# Altium PCB Electrode_Test_Board_v3.2.PcbDoc
Units mil, origin at the board's own origin, x right, y up, seen from the top; angles counter-clockwise.
Board outline 688.39 x 1242.84 mil, 2 copper layers (Top Layer, Bottom Layer), stack 61.811 mil thick; 45 components, 24 nets, 100 pads, 29 vias.
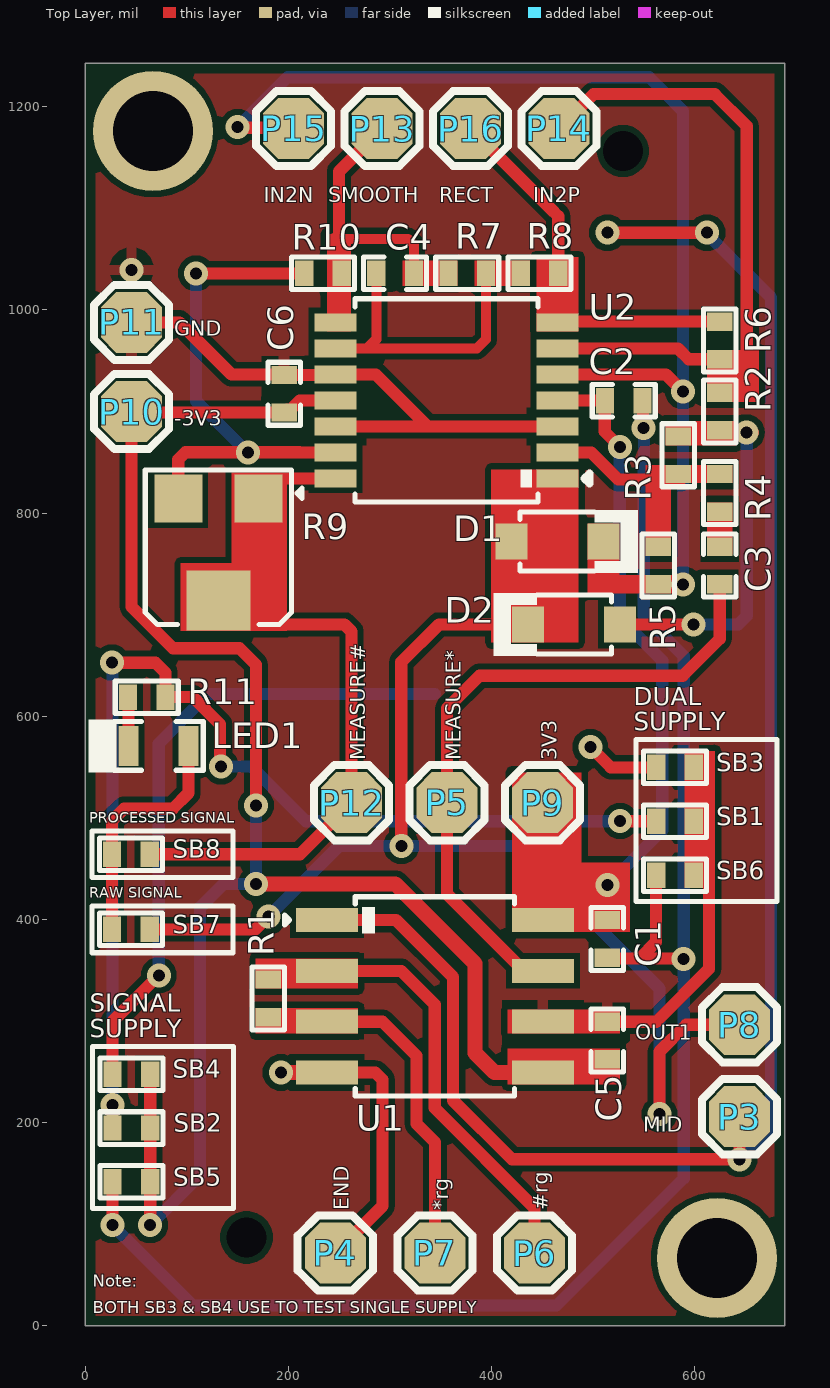
[diagram p0: Top Layer view]
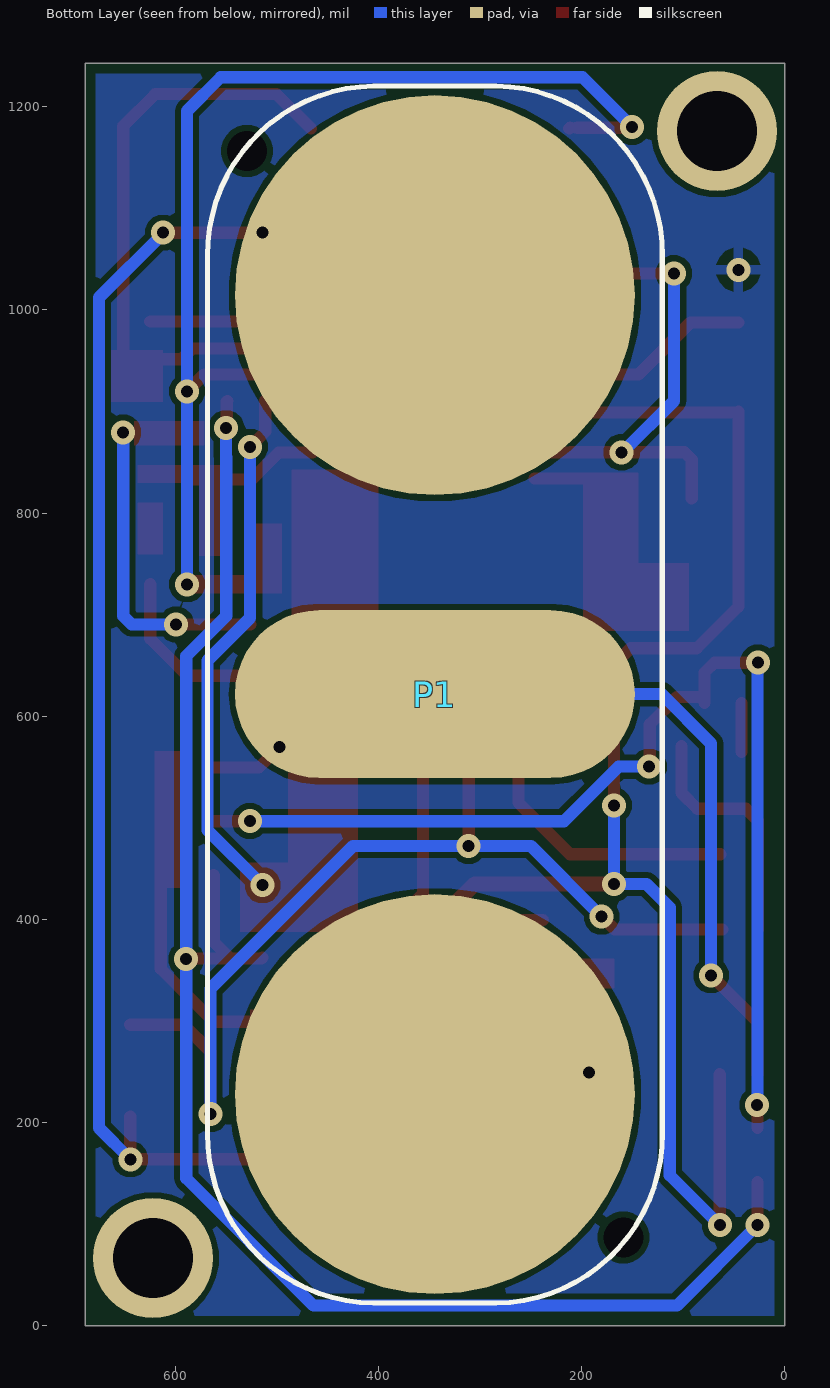
[diagram p1: Bottom Layer view, seen from below]
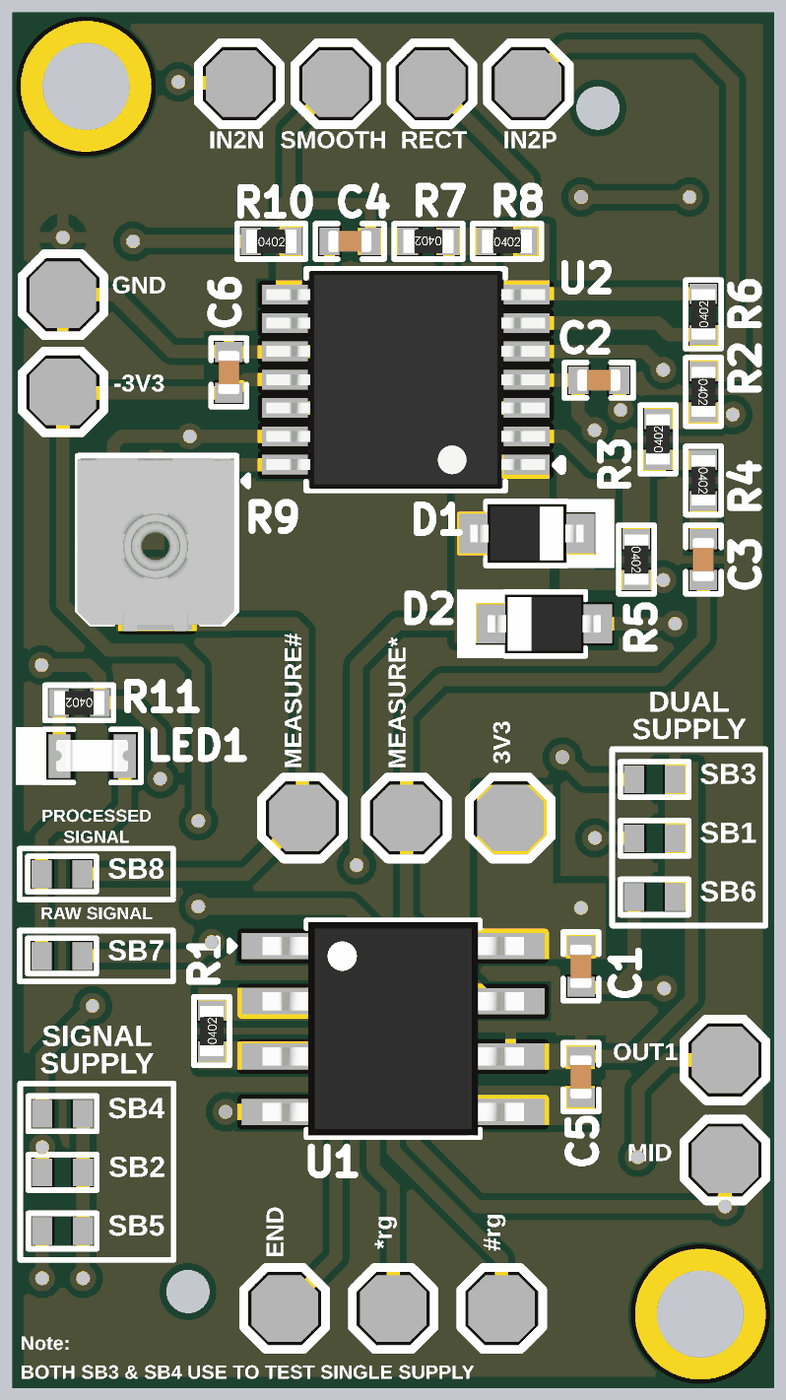
[diagram p2: 3D render of the assembled board from above, using the file's embedded part models]

## Layer stack, top to bottom
Top Solder: solder mask 0.394, SM-001, Dk 3.5
Top Layer: signal copper 1.378
Core: core 59.055, FR-4, Dk 4.8
Bottom Layer: signal copper 1.378
Bottom Solder: solder mask 0.394, SM-001, Dk 3.5

## Board outline
0,0 -0.04,1242.82 688.35,1242.79 688.34,-0.02

## Design rules (kind name [scope] priority, off if disabled: settings)
BoardOutlineClearance [All] p1: gap=0 ignorepadtopadclearanceinfootprint=FALSE except(10: Poly-OutlineEdge)
Clearance [All] p1: gap=6 ignorepadtopadclearanceinfootprint=FALSE except(4: Arc-SMDPad Track-SMDPad SMDPad-SMDPad)
MinimumSolderMaskSliver [All] p1: minsoldermaskwidth=0
PolygonConnect [All] p1: connectstyle=Relief reliefconductorwidth=10 reliefentries=4 polygonreliefangle="90 Angle" airgapwidth=10
RoutingVias [All] p1: holewidth=11.81 width=23.62 viastyle="Through Hole" minholewidth=7.87 minwidth=13.78 maxholewidth=31.5 maxwidth=62.99
SilkToSilkClearance [All] p1: silktosilkclearance=0
SilkToSolderMaskClearance [IsPad] p1: minsilkscreentomaskgap=0 clearancetoexposedcopper=TRUE
SolderMaskExpansion [All] p1: expansion=4 istentingtop=FALSE
Width [All] p1: maxlimit=50 minlimit=10 preferedwidth=15 minimp=50.000000 maximp=50.000000 favimp=50.000000
27 further rules are at their usual default settings.

## Components (designator, comment, footprint, x,y, rotation, side; value= is the part's Value field where it differs from the comment)
C1 "1uF" Cap-0402 513.77,380.97 r270 top
C2 "0.1uF" Cap-0402 529.95,910.52 r0 top
C3 "10nF" Cap-0402 624.47,748.5 r90 top
C4 "1uF" Cap-0402 304.95,1036.02 r180 top
C5 "1uF" Cap-0402 513.77,280.97 r90 top
C6 "0.1uF" Cap-0402 195.63,917.56 r90 top
D1 "1N4148WS" SOD-323 480.78,690.47 r0 top
D2 "1N4148WS" SOD-323 464.97,772 r180 top
LED1 "Orange" LED-0603 72.08,570.98 r180 top
P1 "SEMG Sensor" sEMG-sensor 344.17,621.41 r0 bottom locked
P3 "Test Point" Test-point 644,206 r180 top
P4 "Test Point" Test-point 246.09,71.8 r270 top
P5 "TEST POINT" Test-point 356.04,515 r270 top
P6 "TEST POINT" Test-point 442.23,71.8 r270 top
P7 "TEST POINT" Test-point 344.16,71.8 r270 top
P8 "TEST POINT" Test-point 644,296.47 r0 top
P9 "TEST POINT" Test-point 450.05,515 r90 top
P10 "TEST POINT" Test-point 45.54,900.02 r0 top
P11 "TEST POINT" Test-point 45.54,987.79 r0 top
P12 "TEST POINT" Test-point 262.04,515 r0 top
P13 "TEST POINT" Test-point 292.08,1178.57 r90 top
P14 "TEST POINT" Test-point 466.23,1178.57 r90 top
P15 "TEST POINT" Test-point 205,1178.57 r90 top
P16 "TEST POINT" Test-point 379.15,1178.57 r0 top
R1 "240R" Res-0402 180.12,322.47 r90 top
R2 "150K" Res-0402 624.47,900.02 r270 top
R3 "150K" Res-0402 583.47,857.02 r90 top
R4 "150K" Res-0402 624.47,820.02 r270 top
R5 "150K" Res-0402 563.92,748.51 r270 top
R6 "150K" Res-0402 624.47,970.02 r90 top
R7 "80.6K" Res0402 375.96,1036.02 r180 top
R8 "80.6K" Res0402 446.97,1036.02 r0 top
R9 "100K" TC33X-2-104E_ 170.24,814.59 r180 top
R10 "1K" Res-0402 233.95,1036.02 r0 top
R11 "1K" Res-0402 60.5,619 r180 top
SB1 "Solder Bridge 0402" "Solder Bridge 0402" 580.34,496.69 r180 top
SB2 "Solder Bridge 0402" "Solder Bridge 0402" 45.34,194.8 r180 top
SB3 "Solder Bridge 0402" "Solder Bridge 0402" 580.34,549.8 r0 top
SB4 "Solder Bridge 0402" "Solder Bridge 0402" 45.34,247.8 r0 top
SB5 "Solder Bridge 0402" "Solder Bridge 0402" 45.34,141.8 r0 top
SB6 "Solder Bridge 0402" "Solder Bridge 0402" 580.34,443.59 r0 top
SB7 "Solder Bridge 0402" "Solder Bridge 0402" 44.84,390.35 r180 top
SB8 "Solder Bridge 0402" "Solder Bridge 0402" 44.84,464.3 r180 top
U1 "AD8221ARZ-R7" SOIC-8 344.1,324.47 r0 top
U2 "TL084CPWR" 14-TSSOP 355.47,911.02 r180 top

## Footprints (in the part's own frame and the unit in brackets; to place one, negate y for a bottom-side part, rotate by r counter-clockwise, add the part's x,y. Pads: shape width x height; smd on the part's side, far side on the other; paste and mask are expansions set on the pad)
14-TSSOP [mm]
  rect 1.05x0.45 smd: 1(-2.775,1.95) 2(-2.775,1.3) 3(-2.775,0.65) 4(-2.775,0) 5(-2.775,-0.65) 6(-2.775,-1.3) 7(-2.775,-1.95) 8(2.775,-1.95) 9(2.775,-1.3) 10(2.775,-0.65) 11(2.775,0) 12(2.775,0.65) 13(2.775,1.3) 14(2.775,1.95)
  silkscreen extent -3.58,-2.54 2.29,2.54, body extent -3.2,-2.5 3.2,2.5, height 1.2
Cap-0402 [mil]
  rect 18x25 smd mask+2.36: 1(-18.5,0) 2(18.5,0)
  silkscreen extent -31,-16 31,16, body extent -20,-10 20,10, height 19
LED-0603 [mm]
  rect 0.5x1 smd: 1(-0.75,0) 2(0.75,0)
  silkscreen extent -1.12,-0.66 1.75,0.66, body extent -0.82,-0.37 0.82,0.36, height 0.68
Res0402 [mil]
  rect 18x25 smd mask+4: 1(-18.5,0) 2(18.5,0)
  silkscreen extent -32,-17 32,16, body extent -23,-11 23,11, height 16
Res-0402 [mil]
  rect 18x25 smd mask+2.17: 1(-18.5,0) 2(18.5,0)
  silkscreen extent -32,-17 32,16, body extent -23,-11 23,11, height 16
sEMG-sensor [mm]
  round 10 smd: 1(0,9.987) 2(0,-9.987)
  oval 10x4.2 smd: 3(0,-0.013)
  silkscreen extent -5.68,-15.21 5.68,15.21
SOD-323 [mm]
  rect 0.8x0.9 smd mask+0.055: 1(-1.15,0) 2(1.15,0)
  silkscreen extent -2.01,-0.79 0.94,0.79, body extent -1.3,-0.67 1.3,0.67, height 1.1
SOIC-8 [mm]
  rect 1.55x0.6 smd: 1(-2.7,1.905) 2(-2.7,0.635) 3(-2.7,-0.635) 4(-2.7,-1.905) 5(2.7,-1.905) 6(2.7,-0.635) 7(2.7,0.635) 8(2.7,1.905)
  silkscreen extent -3.76,-2.49 1.99,2.49, body extent -3,-2.45 3,2.45, height 1.7
"Solder Bridge 0402" [mil]
  rect 18x25 smd mask+2.17: 1(-18.5,0) 2(18.5,0)
  silkscreen extent -32,-17 32,16
TC33X-2-104E_ [mm]
  rect 1.2x1.2 smd: 1(0,0) 3(2,0)
  rect 1.6x1.5 smd: 2(1,2.55)
  silkscreen extent -1.09,-0.71 2.83,3.15, body extent -0.76,-0.64 2.84,3.32, height 1.13
Test-point [mil]
  oct 60x60 smd: 1(0,0)
  silkscreen extent -37,-37 37,37

## Part data
C1 C4 C5: library part CC0402KRX5R7BB105, "CAP CER 1UF 16V X5R 0402", Case Code (Imperial)=0402, Case Code (Metric)=1005, Dielectric=X5R, LCSC Part Number=C325464, Manufacturer=Yageo, Max Operating Temperature=85°C, Min Operating Temperature=-55°C, Supplier Part Number 1=311-1691-6-ND, Tolerance=10%, Voltage Rating=16V, Capacitance=1uF, Case/Package=0402, ComponentLink1Description=http://www.yageo.com/documents/recent/UPY-GPHC_X5R_4V-to-50V_12.pdf?src-supplier=Avnet+Europe, ComponentLink1URL=http://www.yageo.com/documents/recent/UPY-GPHC_X5R_4V-to-50V_12.pdf?src-supplier=Avnet+Europe, Composition=Ceramic, Depth=0.5mm, Halogen Free="Halogen Free", Height=0.5mm, Item Type=Capacitor, Lead Free="Lead Free", Length=1mm, Manufacturer Part Number=CC0402KRX5R7BB105, Mount="Surface Mount", Packaging="Tape and Reel", Pricing 1="1=0.36, 10=0.252, 100=0.1512, 500=0.1134, 1000=0.09576, 2500=0.09072, 5000=0.08568 (USD)", Radiation Hardening=No, Stock 1=1405667, Supplier 1=Digi-Key, Termination=SMD/SMT, Thickness=0.022inch, Voltage Rating (DC)=16V, Weight=2.3E-05oz, Width=0.02inch
C2 C6: library part GRM155R71H104ME14D, "CAP CER 0.1UF 50V X7R 0402", Capacitance=100nF, Case/Package=0402, LCSC Part Number=C182412, Manufacturer=Murata, Max Operating Temperature=125°C, Min Operating Temperature=-55°C, Tolerance=20%, Voltage Rating=50V, Category="Ceramic Capacitors", ComponentLink1Description=http://www.mouser.com/ds/2/281/c02e-2905.pdf?src-supplier=Mouser, ComponentLink1URL=http://www.mouser.com/ds/2/281/c02e-2905.pdf?src-supplier=Mouser, ComponentLink2Description=http://search.murata.co.jp/Ceramy/image/img/A01X/G101/ENG/GRM155R71H104ME14-01.pdf?src-supplier=Digi-Key, ComponentLink2URL=http://search.murata.co.jp/Ceramy/image/img/A01X/G101/ENG/GRM155R71H104ME14-01.pdf?src-supplier=Digi-Key, ComponentLink3Description=http://psearch.en.murata.com/capacitor/product/GRM155R71H104ME14%23.pdf?src-supplier=Avnet, ComponentLink3URL=http://psearch.en.murata.com/capacitor/product/GRM155R71H104ME14%23.pdf?src-supplier=Avnet, Item Type=Capacitor, Length=0.039inch, Manufacturer Part Number=GRM155R71H104ME14D, Mount="Surface Mount", Packaging="Cut Tape", Pricing 1="10000=0.00444, 20000=0.00420, 40000=0.00396, 60000=0.00372, 80000=0.00348, 100000=0.00324, 1000000=0.00300 (USD)", RoHS=Yes, RoHS Compliant=Yes, Stock 1=100000, Supplier 1=Avnet, Supplier Part Number 1=GRM155R71H104ME14D, Thickness=0.022inch, Width=0.02inch
C3: library part CC0402KRX7R9BB103, "CAP CER 10000PF 50V X7R 0402", Case Code (Imperial)=0402, Case Code (Metric)=1005, Dielectric=X7R, LCSC Part Number=C60133, Manufacturer=Yageo, Max Operating Temperature=125°C, Min Operating Temperature=-55°C, Package Quantity=1, Resistor Type=Ceramic, Tolerance=10%, Voltage=50V, Capacitance=10nF, Case/Package=0402, Category="Ceramic Capacitors", ComponentLink1Description=https://datasheet.ciiva.com/11788/0900766b8079c870-11788375.pdf?src-supplier=RSComponents, ComponentLink1URL=https://datasheet.ciiva.com/11788/0900766b8079c870-11788375.pdf?src-supplier=RSComponents, ComponentLink2Description=https://datasheet.ciiva.com/26862/getdatasheetpartid-138248-26862642.pdf?src-supplier=Verical, ComponentLink2URL=https://datasheet.ciiva.com/26862/getdatasheetpartid-138248-26862642.pdf?src-supplier=Verical, ComponentLink3Description=https://datasheet.ciiva.com/7978/1489800-7978093.pdf?src-supplier=Element14, ComponentLink3URL=https://datasheet.ciiva.com/7978/1489800-7978093.pdf?src-supplier=Element14, ComponentLink4Description=https://datasheet.ciiva.com/28450/1489800-28450377.pdf?src-supplier=Element14, ComponentLink4URL=https://datasheet.ciiva.com/28450/1489800-28450377.pdf?src-supplier=Element14, ComponentLink5Description=https://datasheet.ciiva.com/176/mlccorderingcode-176349.pdf?src-supplier=Digi-Key, ComponentLink5URL=https://datasheet.ciiva.com/176/mlccorderingcode-176349.pdf?src-supplier=Digi-Key, ComponentLink6Description=https://datasheet.ciiva.com/176/mlccorderingcode-176348.pdf?src-supplier=Digi-Key, ComponentLink6URL=https://datasheet.ciiva.com/176/mlccorderingcode-176348.pdf?src-supplier=Digi-Key, ComponentLink7Description=https://datasheet.ciiva.com/176/mlccorderingcode-176350.pdf?src-supplier=Digi-Key, ComponentLink7URL=https://datasheet.ciiva.com/176/mlccorderingcode-176350.pdf?src-supplier=Digi-Key, Depth=0.5mm, Halogen Free="Halogen Free", Height=0.5mm, Item Type=Capacitor, Lead Free="Lead Free", Length=1mm, Manufacturer Part Number=CC0402KRX7R9BB103, Mount="Surface Mount", Packaging="Tape and Reel", Pricing 1="10000=0.00178 (USD)", Radiation Hardening=No, Reach SVHC Compliant=Yes, RoHS=Yes, RoHS Compliant=Yes, Series=CC, Stock 1=995000, Supplier 1=Avnet, Supplier Part Number 1=CC0402KRX7R9BB103, Termination=SMD/SMT, Thickness=0.022inch, Voltage Rating=50V, Voltage Rating (DC)=50V, Width=0.02inch
D1 D2: "100V -55℃~+150℃@(Tj) 400mW Single 1.25V@150mA 4ns 1μA@75V 200mA SOD-323 Switching Diode ROHS", Manufacturer=YFW, ComponentLink1Description=LCSC, ComponentLink1URL=https://lcsc.com/product-detail/Switching-Diode_YFW-1N4148WS_C1884546.html, Manufacturer Part Number=1N4148WS
LED1: library part 19-217/S2C-AQ1R1B/3T, "0603(H=0.4mm) λD=600.5~612.5nm VR=5V VF=1.7V~2.2V IF=25mA PD=60mW", LCSC Part Number=C146215, Manufacturer=Everlight, Supplier Part Number 1=1080-19-217/S2C-AQ1R1B/3TTR-ND, Category=LEDs, ComponentLink1Description=LCSC, ComponentLink1URL=https://www.lcsc.com/product-detail/Light-Emitting-Diodes-LED_Everlight-Elec-19-217-S2C-AQ1R1B-3T_C146215.html, Item Type=LED, Manufacturer Part Number=19-217/S2C-AQ1R1B/3T, RoHS=No, Supplier 1=Digi-Key
P1: "Sensor Connecting Pads"
P3 P4: library part "TEST POINT", "Test Point ON", Item Type="TEST POINT"
P5 P6 P7 P8 P9 P10 P11 P12 P13 P14 P15 P16: "Test Point ON", Item Type="TEST POINT"
R1: library part RC0402FR-07240RL, "RES 240 OHM 1% 1/16W 0402", Case Code (Imperial)=0402, Case Code (Metric)=1005, Manufacturer=Yageo, Max Operating Temperature=155°C, Max Power Dissipation=63mW, Min Operating Temperature=-55°C, Package Quantity=1, Resistance Tolerance=1%, Resistor Type="Thick Film", Supplier Part Number 1=603-RC0402FR-07240RL, Temperature Coefficient=100ppm/°C, Voltage Rating=50V, Case/Package=0402, Category="Chip SMD Resistors", ComponentLink1Description=https://datasheet.ciiva.com/7849/1018594-7849915.pdf?src-supplier=Element14, ComponentLink1URL=https://datasheet.ciiva.com/7849/1018594-7849915.pdf?src-supplier=Element14, ComponentLink2Description=https://datasheet.ciiva.com/7849/1018594-7849916.pdf?src-supplier=Element14, ComponentLink2URL=https://datasheet.ciiva.com/7849/1018594-7849916.pdf?src-supplier=Element14, ComponentLink3Description=https://datasheet.ciiva.com/2519/pyu-r-int-thick-7-2519157.pdf?src-supplier=Digi-Key, ComponentLink3URL=https://datasheet.ciiva.com/2519/pyu-r-int-thick-7-2519157.pdf?src-supplier=Digi-Key, ComponentLink4Description=https://datasheet.ciiva.com/2519/pyu-r-int-thick-7-2519158.pdf?src-supplier=Digi-Key, ComponentLink4URL=https://datasheet.ciiva.com/2519/pyu-r-int-thick-7-2519158.pdf?src-supplier=Digi-Key, ComponentLink5Description=https://datasheet.ciiva.com/2519/pyu-r-int-thick-7-2519156.pdf?src-supplier=Digi-Key, ComponentLink5URL=https://datasheet.ciiva.com/2519/pyu-r-int-thick-7-2519156.pdf?src-supplier=Digi-Key, ComponentLink6Description=https://datasheet.ciiva.com/12669/pyu-rc0402-51-rohs-l-6-r-12669689.pdf?src-supplier=Mouser, ComponentLink6URL=https://datasheet.ciiva.com/12669/pyu-rc0402-51-rohs-l-6-r-12669689.pdf?src-supplier=Mouser, ComponentLink7Description=https://datasheet.ciiva.com/17419/pyu-rc0402-51-rohs-l-6-r-17419482.pdf?src-supplier=Future+Electronics, ComponentLink7URL=https://datasheet.ciiva.com/17419/pyu-rc0402-51-rohs-l-6-r-17419482.pdf?src-supplier=Future+Electronics, Construction=Rectangular, Depth=0.5mm, Features="Moisture Resistant", Height=0.016inch, Lead Free="Lead Free", Length=1mm, Manufacturer Part Number=RC0402FR-07240RL, Military Standard=Not, Number of Terminations=2, Packaging="Tape and Reel", Power Rating=63mW, Pricing 1="1=0.10000, 10=0.01200, 50=0.01200, 100=0.00500, 1000=0.00300, 10000=0.00100 (USD)", REACH SVHC=Unknown, Resistance=240R, RoHS=Yes, RoHS Compliant=Yes, Series=RC, Size Code=0402, Stock 1=1903202, Supplier 1=Mouser, Termination=SMD/SMT, Tolerance=1%, Voltage Rating (DC)=50V, Width=0.02inch
R2 R3 R4 R5 R6: library part RC0402JR-07150KL, "RES SMD 0402 150kOhm 5% Paper T/R", Case Code (Imperial)=0402, Case Code (Metric)=1005, LCSC Part Number=C137919, Manufacturer=Yageo, Max Operating Temperature=155°C, Max Power Dissipation=63mW, Min Operating Temperature=-55°C, Package Quantity=1, Resistance=150kR, Resistance Tolerance=5%, Resistor Type="Thick Film", Temperature Coefficient=100ppm/°C, Voltage Rating=50V, Case/Package=0402, Category="Chip SMD Resistors", ComponentLink1Description=https://datasheet.ciiva.com/7983/1018594-7983551.pdf?src-supplier=Element14, ComponentLink1URL=https://datasheet.ciiva.com/7983/1018594-7983551.pdf?src-supplier=Element14, ComponentLink2Description=https://datasheet.ciiva.com/2518/pyu-r-int-thick-7-2518929.pdf?src-supplier=Digi-Key, ComponentLink2URL=https://datasheet.ciiva.com/2518/pyu-r-int-thick-7-2518929.pdf?src-supplier=Digi-Key, ComponentLink3Description=https://datasheet.ciiva.com/2518/pyu-r-int-thick-7-2518930.pdf?src-supplier=Digi-Key, ComponentLink3URL=https://datasheet.ciiva.com/2518/pyu-r-int-thick-7-2518930.pdf?src-supplier=Digi-Key, ComponentLink4Description=https://datasheet.ciiva.com/2518/pyu-r-int-thick-7-2518928.pdf?src-supplier=Digi-Key, ComponentLink4URL=https://datasheet.ciiva.com/2518/pyu-r-int-thick-7-2518928.pdf?src-supplier=Digi-Key, ComponentLink5Description=https://datasheet.ciiva.com/7850/1018594-7850149.pdf?src-supplier=Element14, ComponentLink5URL=https://datasheet.ciiva.com/7850/1018594-7850149.pdf?src-supplier=Element14, ComponentLink6Description=https://datasheet.ciiva.com/17072/pyu-rc0402-51-rohs-l-6-r-17072379.pdf?src-supplier=Future+Electronics, ComponentLink6URL=https://datasheet.ciiva.com/17072/pyu-rc0402-51-rohs-l-6-r-17072379.pdf?src-supplier=Future+Electronics, ComponentLink7Description=https://datasheet.ciiva.com/15189/getdatasheetpartid-251830-15189543.pdf?src-supplier=Verical, ComponentLink7URL=https://datasheet.ciiva.com/15189/getdatasheetpartid-251830-15189543.pdf?src-supplier=Verical, Construction=Rectangular, Depth=0.5mm, Features="Moisture Resistant", Height=0.016inch, Item Type=Resistor, Lead Free="Lead Free", Length=1mm, Manufacturer Part Number=RC0402JR-07150KL, Military Standard=Not, Number of Terminations=2, Packaging="Tape and Reel", Power Rating=63mW, Pricing 1="10000=0.00100 (USD)", REACH SVHC="No SVHC", RoHS=Yes, RoHS Compliant=Yes, Series=RC, Size Code=0402, Stock 1=170000, Supplier 1="Arrow Electronics", Supplier Part Number 1=RC0402JR-07150KL, Termination=SMD/SMT, Tolerance=5%, Weight=2.3E-05oz, Width=0.02inch
R7 R8: library part RC-02W8062FT, "1/16W 50V ±1% ±200ppm/℃ -55℃~+155℃ 80.6kΩ 0402 Chip Resistor - Surface Mount ROHS", Manufacturer=FH, Manufacture Part Number=RC-02W8062FT
R9: library part TC33X-2-104E, "TRIMMER 100K OHM 0.1W J LEAD TOP", Color=Silver, LCSC Part Number=C719186, Manufacturer=Bourns, Max Operating Temperature=100°C, Max Power Dissipation=100mW, Min Operating Temperature=-40°C, Package Quantity=2500, Resistance=100kR, Resistance Tolerance=25%, Resistor Type=Carbon,Cermet, Temperature Coefficient=250ppm/°C, Voltage Rating (DC)=50V, Category="Variable Resistors and Potentiometers", ComponentLink1Description=https://datasheet.ciiva.com/11832/0900766b802749b3-11832506.pdf?src-supplier=RSComponents, ComponentLink1URL=https://datasheet.ciiva.com/11832/0900766b802749b3-11832506.pdf?src-supplier=RSComponents, ComponentLink2Description=https://datasheet.ciiva.com/8700/tc33-8700395.pdf?src-supplier=Avnet, ComponentLink2URL=https://datasheet.ciiva.com/8700/tc33-8700395.pdf?src-supplier=Avnet, ComponentLink3Description=https://datasheet.ciiva.com/2155/tc33-2155965.pdf?src-supplier=Digi-Key, ComponentLink3URL=https://datasheet.ciiva.com/2155/tc33-2155965.pdf?src-supplier=Digi-Key, ComponentLink4Description=https://datasheet.ciiva.com/7953/1818686-7953181.pdf?src-supplier=Element14, ComponentLink4URL=https://datasheet.ciiva.com/7953/1818686-7953181.pdf?src-supplier=Element14, ComponentLink5Description=https://datasheet.ciiva.com/16716/70155234-16716301.pdf?src-supplier=Allied+Electronics, ComponentLink5URL=https://datasheet.ciiva.com/16716/70155234-16716301.pdf?src-supplier=Allied+Electronics, ComponentLink6Description=https://datasheet.ciiva.com/2155/tc33-2155966.pdf?src-supplier=Digi-Key, ComponentLink6URL=https://datasheet.ciiva.com/2155/tc33-2155966.pdf?src-supplier=Digi-Key, ComponentLink7Description=https://datasheet.ciiva.com/7953/1818686-7953182.pdf?src-supplier=Element14, ComponentLink7URL=https://datasheet.ciiva.com/7953/1818686-7953182.pdf?src-supplier=Element14, ComponentLink8Description=https://datasheet.ciiva.com/2155/tc33-2155967.pdf?src-supplier=Digi-Key, ComponentLink8URL=https://datasheet.ciiva.com/2155/tc33-2155967.pdf?src-supplier=Digi-Key, Depth=3.8mm, Height=0.047inch, Item Type=Trimmer, Length=3mm, Manufacturer Part Number=TC33X-2-104E, Military Standard=Not, Mount="Surface Mount", Number of Turns=1, Packaging="Tape and Reel", Power Rating=100mW, Pricing 1="2500=0.15500, 5000=0.13130 (USD)", Radiation Hardening=No, REACH SVHC="No SVHC", RoHS=Yes, RoHS Compliant=Yes, Series=TC33, Stock 1=12500, Supplier 1="Arrow Electronics", Supplier Part Number 1=TC33X-2-104E, Termination="Foot Print", Tolerance=25%, Weight=29.4mg, Width=0.118inch
R10 R11: library part RC0402JR-071KL, "RES 1K OHM 5% 1/16W 0402", Case Code (Imperial)=0402, Case Code (Metric)=1005, LCSC Part Number=C105637, Manufacturer=Yageo, Max Operating Temperature=155°C, Max Power Dissipation=63mW, Min Operating Temperature=-55°C, Package Quantity=1, Power Rating=62.5mW, Resistance=1kR, Resistance Tolerance=5%, Resistor Type="Thick Film", Supplier Part Number 1=311-1.0KJRCT-ND, Temperature Coefficient=100ppm/°C, Voltage Rating=50V, Case/Package=0402, Category="Chip SMD Resistors", ComponentLink1Description=https://datasheet.ciiva.com/7983/1018594-7983558.pdf?src-supplier=Element14, ComponentLink1URL=https://datasheet.ciiva.com/7983/1018594-7983558.pdf?src-supplier=Element14, ComponentLink2Description=https://datasheet.ciiva.com/2452/pyu-r-int-thick-7-2452756.pdf?src-supplier=Digi-Key, ComponentLink2URL=https://datasheet.ciiva.com/2452/pyu-r-int-thick-7-2452756.pdf?src-supplier=Digi-Key, ComponentLink3Description=https://datasheet.ciiva.com/2452/pyu-r-int-thick-7-2452757.pdf?src-supplier=Digi-Key, ComponentLink3URL=https://datasheet.ciiva.com/2452/pyu-r-int-thick-7-2452757.pdf?src-supplier=Digi-Key, ComponentLink4Description=https://datasheet.ciiva.com/2452/pyu-r-int-thick-7-2452755.pdf?src-supplier=Digi-Key, ComponentLink4URL=https://datasheet.ciiva.com/2452/pyu-r-int-thick-7-2452755.pdf?src-supplier=Digi-Key, ComponentLink5Description=https://datasheet.ciiva.com/7850/1018594-7850170.pdf?src-supplier=Element14, ComponentLink5URL=https://datasheet.ciiva.com/7850/1018594-7850170.pdf?src-supplier=Element14, ComponentLink6Description=https://datasheet.ciiva.com/7850/1018594-7850171.pdf?src-supplier=Element14, ComponentLink6URL=https://datasheet.ciiva.com/7850/1018594-7850171.pdf?src-supplier=Element14, ComponentLink7Description=https://datasheet.ciiva.com/17081/pyu-rc0402-51-rohs-l-6-r-17081438.pdf?src-supplier=Future+Electronics, ComponentLink7URL=https://datasheet.ciiva.com/17081/pyu-rc0402-51-rohs-l-6-r-17081438.pdf?src-supplier=Future+Electronics, Construction=Rectangular, Depth=0.5mm, Features="Moisture Resistant", Height=0.016inch, Item Type=Resistor, Lead Free="Lead Free", Length=0.039inch, Manufacturer Part Number=RC0402JR-071KL, Military Standard=Not, Number of Terminations=2, Packaging="Tape and Reel", Pricing 1="1=0.10000, 10=0.01300, 100=0.00540, 1000=0.00244, 2500=0.00212, 5000=0.00175 (USD)", REACH SVHC="No SVHC", RoHS=Yes, RoHS Compliant=Yes, Series=RC, Size Code=0402, Stock 1=452315, Supplier 1=Digi-Key, Termination=SMD/SMT, Tolerance=5%, Width=0.02inch
SB1 SB2 SB3 SB4 SB5 SB6 SB7 SB8: "Solder Bridge ON"
U1: "IC OPAMP INSTR 825KHZ 8SOIC", Case/Package=SOIC, Input Bias Current=1.5nA, Input Offset Voltage (Vos)=60uV, Input Resistance=100GR, LCSC Part Number=C13342, Manufacturer="Analog Devices", Max Dual Supply Voltage=18V, Max Operating Temperature=85°C, Max Power Dissipation=200mW, Min Dual Supply Voltage=2.3V, Min Operating Temperature=-40°C, Nominal Supply Current=1mA, Operating Supply Voltage=36V, Output Current per Channel=18mA, Package Quantity=1000, Power Supply Rejection Ratio (PSRR)=130dB, Quiescent Current=900uA, Supplier Part Number 1=584-AD8221ARZ-R7, Voltage Gain=60dB, -3db Bandwidth=825kHz, Bandwidth=562kHz, Category="Amplifiers - Op Amps, Buffer, Instrumentation", Common Mode Rejection Ratio=80dB, ComponentLink1Description=https://datasheet.ciiva.com/15128/getdatasheetpartid-313520-15128733.pdf?src-supplier=Verical, ComponentLink1URL=https://datasheet.ciiva.com/15128/getdatasheetpartid-313520-15128733.pdf?src-supplier=Verical, ComponentLink2Description=https://datasheet.ciiva.com/2975/ad8221-2975658.pdf?src-supplier=Avnet, ComponentLink2URL=https://datasheet.ciiva.com/2975/ad8221-2975658.pdf?src-supplier=Avnet, ComponentLink3Description=https://datasheet.ciiva.com/2975/ad8221-2975980.pdf?src-supplier=Avnet, ComponentLink3URL=https://datasheet.ciiva.com/2975/ad8221-2975980.pdf?src-supplier=Avnet, ComponentLink4Description=https://datasheet.ciiva.com/6628/ad8221-6628618.pdf?src-supplier=Digi-Key, ComponentLink4URL=https://datasheet.ciiva.com/6628/ad8221-6628618.pdf?src-supplier=Digi-Key, ComponentLink5Description=https://datasheet.ciiva.com/6628/ad8221-6628619.pdf?src-supplier=Digi-Key, ComponentLink5URL=https://datasheet.ciiva.com/6628/ad8221-6628619.pdf?src-supplier=Digi-Key, ComponentLink6Description=https://datasheet.ciiva.com/6628/ad8221-6628617.pdf?src-supplier=Digi-Key, ComponentLink6URL=https://datasheet.ciiva.com/6628/ad8221-6628617.pdf?src-supplier=Digi-Key, ComponentLink7Description=https://datasheet.ciiva.com/48709/001249009-da-01-en-ic-amp-inst-prec-ad8221arz-r7-soic-8-adi-48709526.pdf?src-supplier=Conrad, ComponentLink7URL=https://datasheet.ciiva.com/48709/001249009-da-01-en-ic-amp-inst-prec-ad8221arz-r7-soic-8-adi-48709526.pdf?src-supplier=Conrad, Contact Plating=Tin,Matte, Item Type=IC, Lead Free="Contains Lead", Manufacturer Part Number=AD8221ARZ-R7, Number of Channels=1, Number of Circuits=1, Number of Elements=1, Number of Pins=8, Operating Supply Current=1mA, Packaging="Tape and Reel", Power Dissipation=200mW, Pricing 1="1=7.37000, 10=6.66000, 25=6.35000, 50=6.35000, 100=5.51000, 250=5.27000, 500=4.80000, 1000=4.37000, 10000=4.37000 (USD)", Radiation Hardening=No, RoHS=Yes, RoHS Compliant=Yes, Series=-, Slew Rate=2.5V/µs, Supplier 1=Mouser, Supply Current=1mA
U2: "IC OPAMP JFET 4 CIRCUIT 14TSSOP", Case/Package=TSSOP, Input Bias Current=400pA, Input Offset Voltage (Vos)=15mV, Manufacturer="Texas Instruments", Max Dual Supply Voltage=18V, Max Operating Temperature=125°C, Max Power Dissipation=680mW, Min Dual Supply Voltage=3.5V, Min Operating Temperature=-40°C, Min Supply Voltage=7V, Nominal Supply Current=11.2mA, Operating Supply Current=1.4mA, Package Quantity=1, Quiescent Current=2.8A, Supplier Part Number 1=595-TL084CPWR, Voltage Gain=106.02dB, Bandwidth=3MHz, Category="Amplifiers - Op Amps, Buffer, Instrumentation", Common Mode Rejection Ratio=70dB, ComponentLink1Description=https://datasheet.ciiva.com/34301/1064719-34301936.pdf?src-supplier=Jameco, ComponentLink1URL=https://datasheet.ciiva.com/34301/1064719-34301936.pdf?src-supplier=Jameco, ComponentLink2Description=https://datasheet.ciiva.com/1795/tl081a-1795644.pdf?src-supplier=Digi-Key, ComponentLink2URL=https://datasheet.ciiva.com/1795/tl081a-1795644.pdf?src-supplier=Digi-Key, ComponentLink3Description=https://datasheet.ciiva.com/1795/tl081a-1795643.pdf?src-supplier=Digi-Key, ComponentLink3URL=https://datasheet.ciiva.com/1795/tl081a-1795643.pdf?src-supplier=Digi-Key, ComponentLink4Description=https://datasheet.ciiva.com/1795/tl081a-1795645.pdf?src-supplier=Digi-Key, ComponentLink4URL=https://datasheet.ciiva.com/1795/tl081a-1795645.pdf?src-supplier=Digi-Key, ComponentLink5Description=https://datasheet.ciiva.com/14459/tl082-14459749.pdf?src-supplier=Avnet, ComponentLink5URL=https://datasheet.ciiva.com/14459/tl082-14459749.pdf?src-supplier=Avnet, ComponentLink6Description=https://datasheet.ciiva.com/48707/001072249-da-01-en-ic-opamp-jfet-3mh-tl084cpwr-tssop-14-tid-48707867.pdf?src-supplier=Conrad, ComponentLink6URL=https://datasheet.ciiva.com/48707/001072249-da-01-en-ic-opamp-jfet-3mh-tl084cpwr-tssop-14-tid-48707867.pdf?src-supplier=Conrad, Contact Plating=Gold, Gain Bandwidth Product=3MHz, Lead Free="Lead Free", Manufacturer Part Number=TL084CPWR, Max I/O Voltage=15mV, Max Supply Voltage=18V, Nominal Gain Bandwidth Product=3MHz, Number of Amplifiers=4, Number of Channels=4, Number of Circuits=4, Number of Elements=4, Number of Pins=14, Packaging="Tape and Reel", Pricing 1="1=0.64000, 10=0.54500, 50=0.54500, 100=0.37800, 500=0.32000, 1000=0.24700, 2000=0.22500, 10000=0.22500 (USD)", Radiation Hardening=No, REACH SVHC="No SVHC", RoHS=Yes, RoHS Compliant=Yes, Slew Rate=13V/µs, Stock 1=3, Supplier 1=Mouser, Unity Gain Bandwidth Product=3MHz

## Free pads (board coordinates)
  round 118.11 hole 78.74: MH(66.54,1176.07) MH(621.76,66.72)
  round 0 hole 39.37 unplated: MH1(529.17,1156.41) MH2(158.68,87.14)

## Via types
v1: diameter 23.62, hole 11.81, Top Layer to Bottom Layer, tented both sides, 29 vias

## Nets (pads, with @x,y where several pads share a name; then routed paths per layer and width w, separated by ;. In a path a pad name is that pad's centre, name@x,y a point inside that pad or via, vN(x,y) a via of type N, cw(c..) or ccw(c..) an arc to the next point about the centre after c; other vN are vias at no path point)
#rg: P6.1 R1.2 U1.2 | length 405.2
  Top Layer w12: U1.2 310.99,349.47 343.99,316.47 343.99,214.46 442.23,116.22 P6.1
*rg: P7.1 R1.1 U1.3 | length 303.8
  Top Layer w12: U1.3 292.49,299.47 325.99,265.97 325.99,199 344.16,180.83 P7.1
-VCC_3V3: C5.1 C6.1 P10.1 SB2.1 SB4.2 SB5.2 U1.5 U2.11 | length 1714.2
  Top Layer w12: P10.1 P10.1@45.54,899.06 ; v1(63.84,99.14) SB5.2 SB2.1 SB4.2 ; v1(167.95,512.41) 167.95,650.86 151.81,667 86.44,667 45.54,707.9 P10.1@45.54,899.06 ; U2.11 211.09,911.02 202.13,902.06 198.63,902.06 C6.1 P10.1@45.54,899.06
  Top Layer w15: v1@170.54,435 305.16,435 383.5,356.66 383.5,268.73 402.75,249.47 U1.5
  Bottom Layer w12: v1(63.84,99.14) 113,148.3 113,412 136,435 v1(167.95,435) v1(167.95,512.41)
END: P1.1 P4.1 U1.4 | length 292.6
  Top Layer w12: U1.4 285.46,249.47 292.49,242.44 292.49,118.2 P4.1
  Top Layer w15: v1(192.62,249.47) U1.4
IN2N: P14.1 R2.1 R6.1 U2.6 | length 620.7
  Top Layer w12: U2.6 583.29,962.2 593.97,951.52 R6.1 ; P14.1 500.07,1212.42 619.58,1212.42 651,1181 651,936.3
IN2P: D2.1 P15.1 R5.2 U2.5 | length 1148.2
  Top Layer w12: v1@150.71,1179.29 P15.1@204.29,1179.29 ; v1@157,1180 v1@157.71,1179.29 ; P15.1@211.29,1179.29 P15.1@212,1178.57 ; U2.5 571.42,936.61 v1(588.16,919.87) ; R5.2 v1(588.16,730)
  Bottom Layer w12: v1(150,1180) 199,1229 555,1229 588.16,1195.84 v1(588.16,919.87) v1(588.16,730)
Measure: LED1.1 SB7.2 SB8.2 | length 239.9
  Top Layer w12: SB7.2 SB8.2 26.34,497.34 38,509 86,509 101.61,524.61 101.61,537.61 101.61,546.98 LED1.1
Measure#: C3.1 P5.1 U1.7 | length 658.9
  Top Layer w12: U1.7 431.7,349.47 356.04,425.13 P5.1 356.04,607.96 388.09,640 588,640 624.47,676.47 C3.1
Measure*: P12.1 R9.1 R9.2 SB8.1 U2.14 | length 621.2
  Top Layer w12: SB8.1 211.34,464.3 P12.1 262.04,683.44 255.01,690.47 165.76,690.47 ; R9.1 187.86,832.21 192.86,832.21 194.89,834.24 U2.14 ; 171.29,760.75 171.29,796.97 176.51,802.18 R9.1@182.65,802.18
MID: P1.2 P3.1 U1.1 | length 1666.9
  Top Layer w12: U1.1 305.91,399.47 361.99,343.4 361.99,221.91 419.9,164 v1(644,164) P3.1 ; v1@514,1079 517,1079 520,1076 v1(611.97,1076)
  Bottom Layer w12: v1(611.97,1076) 611.97,1075.03 674.81,1012.19 674.81,194.81 v1(644,164)
  other v1: 514,1076
NetC1_2: C1.2 C2.2 SB5.1 SB6.1 | length 1635.9
  Top Layer w12: v1(26.84,99.14) SB5.1 ; C1.2@513.95,362.47 514.69,361.74 545.66,361.74 ; C2.2 549.04,909.93 549.04,884.25 v1(549.63,883.66) ; SB6.1 561.84,377.92 545.66,361.74 ; v1(589,361) 588.26,361.74 545.66,361.74
  Bottom Layer w12: v1(26.84,99.14) 105.99,19.99 463.6,19.99 589,145.39 v1(589,361) 589,659.46 549.63,698.83 549.63,855.14 549.93,855.45 549.93,883.35 v1(549.63,883.66)
NetC3_2: C3.2 R4.2
NetC4_2: C4.2 R7.1 R8.1 U2.9 | length 294.4
  Top Layer w10: U2.9 277.45,962.2 ; C4.2 286.45,971.2 277.45,962.2 ; R7.1 394.46,971.05 385.6,962.2 277.45,962.2
NetD1_2: D1.2 R2.2 R3.2 | length 344.1
  Top Layer w12: D1.2 v1(598.84,690.47) ; R2.2 627.47,878.52 R2.2@630.47,881.52 ; R2.2@630.47,879.52 v1(651,879.52) v1@657,879.52
  Bottom Layer w12: v1(598.84,690.47) 642.64,690.47 651,698.83 v1(651,879.52)
NetLED1_2: LED1.2 R11.2 | length 48
  Top Layer w12: LED1.2@42.55,564.98 R11.2@42.55,613
NetP1_3: P1.3 SB3.1 SB4.1 | length 709.5
  Top Layer w12: SB4.1 26.84,299.61 v1(72.34,345.11) ; v1(497,570) 517.2,549.8 SB3.1
  Bottom Layer w12: v1(72.34,345.11) 72.34,573.33 120.92,621.91 P1.3
NetR3_1: R3.1 R4.1 R5.1 U2.2 | length 139.7
  Top Layer w12: U2.2 497.93,859.83 524.57,833.19 563.92,833.19 ; 563.92,838.52 R3.1@577.47,838.52 ; R3.1@577.47,833.19 585.87,833.19 R3.1@591.19,838.52
NetR9_3: R9.3 R10.1 U2.13 | length 500.2
  Top Layer w12: R9.3 91.5,852.84 98.53,859.87 210.56,859.87 ; v1(109,1036.02) R10.1 ; 210.59,859.83 U2.13
  Bottom Layer w12: v1(109,1036.02) 109,910.48 159.61,859.87 v1(160.37,859.87)
NetR11_1: R11.1 SB1.2 SB2.2 | length 1097.8
  Top Layer w12: SB2.2 26.84,217.33 v1(27,217.49) ; v1@28.56,652.86 69.14,652.86 79,643 R11.1 ; R11.1@79,613 R11.1 ; v1@132.69,552.63 132.69,592.31 106,619 R11.1 ; v1@526.45,496.69 SB1.2
  Bottom Layer w12: v1@26.67,653.08 26.67,217.82 v1(27,217.49) ; v1(133.56,550.5) 163.53,550.5 217.18,496.85 v1@526.3,496.85
  other v1: 526.45,497 26.34,653.08
OUT1: D1.1 D2.2 P8.1 SB7.1 U2.1 | length 1194.6
  Top Layer w12: SB7.1@61.1,390.35 SB7.1 167.28,390.35 179.78,402.85 v1(180.12,402.85) ; v1(310.99,472.36) 310.99,653.38 348.07,690.47 D1.1 ; v1(565.19,208.41) 565.19,270.23 591.43,296.47 P8.1
  Top Layer w15: v1(565.19,208.41) v1@566.84,210.06
  Bottom Layer w12: v1(180.12,402.85) 249.63,472.36 v1(310.99,472.36) 424.89,472.36 565.19,332.06 v1(565.19,208.41)
RECT: P16.1 R6.2 R8.2 U2.7 | length 331.3
  Top Layer w12: P16.1 446.97,1110.76 458.47,1099.26 465.47,1092.26 R8.2 ; U2.7@471.45,988.52 R6.2
SMOOTH: C4.1 P13.1 R7.2 R10.2 U2.8 | length 326.7
  Top Layer w10: 246.09,1070 249.66,1070 317.6,1070 323.45,1064.14 C4.1 ; R10.2@252.45,1039.52 252.45,1061.45
  Top Layer w12: R10.2@246.09,1045.87 246.09,1070 ; R10.2@249.66,1026.96 249.66,1070 249.66,1110.76 249.66,1129.16 249.66,1136.16 P13.1 ; R10.2 R10.2@252.45,1039.52
VCC_3V3: C1.1 C2.1 P9.1 U1.8 U2.4 | length 633.4
  Top Layer w12: U1.8 C1.1 C1.1@513.95,399.47 ; U2.4 464.97,910.77 C2.1@511.2,910.77 ; C2.1 C2.1@511.2,910.77 ; v1(526.12,865.31) 511.2,880.24 C2.1@511.2,910.77
  Bottom Layer w12: v1(513.77,433.77) 567.92,487.92 567.92,655.08 526.12,696.88 v1(526.12,865.31)
VREF_GND: C5.2 C6.2 P11.1 SB1.1 SB3.2 SB6.2 U1.6 U2.3 U2.10 U2.12 | length 942.1
  Top Layer w12: P11.1 92.69,987.79 143.87,936.61 C6.2@195.63,936.61 ; C6.2 U2.10@245.66,936.06 ; U2.12 337.08,885.42 ; U2.10 285.9,936.61 337.08,885.42 ; U1.6 C5.2 562,299.47 614,351.47 614,450.3 ; U2.3 337.08,885.42 ; SB6.2 SB1.1 SB3.2
  other v1: 45.54,1039.56

## Polygon pours and split planes (outlines as drawn)
VREF_GND on Bottom Layer "VREF_GND_L02_P001" (solid, pour order 1): 0,0 -0.04,1242.82 688.35,1242.79 688.34,-0.02
VREF_GND on Top Layer "VREF_GND_L01_P000" (solid, pour order 0): 0,0 -0.04,1242.82 688.35,1242.79 688.34,-0.02

## Other copper
Top Layer:
  rectangle net VREF_GND: 589.84,431.09 620,565.8
  rectangle net VCC_3V3: 419.89,387.66 536.09,456.09
  rectangle net VCC_3V3: 419.89,443.59 488.58,544.96
  rectangle net -VCC_3V3: 415.6,237.66 526.27,273
  rectangle net VREF_GND: 415.6,287.66 526.27,311.28
  rectangle net IN2P: 494.5,721 595.97,739.01
  region net NetR3_1: 576.42,847.52 551.42,847.52 551.42,758.01 576.42,758.01
  rectangle net NetC3_2: 611.97,759.52 636.97,810.52
  rectangle net IN2P: 494.5,721 525.99,789.72
  rectangle net Measure*: 93.92,683.98 198.54,750.72
  rectangle net Measure*: 144.04,686.7 198.54,840.24
  rectangle net SMOOTH: 237.88,978.93 261.45,1075
  rectangle net SMOOTH: 311.97,1023.52 366.47,1048.52
  rectangle net NetC4_2: 382.97,1023.52 437.47,1048.52
  rectangle net RECT: 444.05,978.93 485.39,1052.02
  rectangle net #rg: 167.62,331.97 268.31,361.66
  rectangle net *rg: 167.62,287.66 268.31,312.97
  rectangle net IN2N: 611.97,909.52 663,960.52
  rectangle net OUT1: 399.53,672.75 485.39,843.1
  rectangle net NetR3_1: 557.42,829.52 636.97,847.52
  rectangle net NetD1_2: 570.97,866.52 640.47,890.52

## Silkscreen, mask and mechanical layers (free items; w line width, h text height)
Top Overlay:
  lines w5: 6.5,367.32 6.5,413.37 145.25,413.37 145.25,367.32 6.5,367.32 ; 6.5,441.27 145.25,441.27 145.25,487.33 6.5,487.33 6.5,441.27 ; 7,115.8 7,275.16 145.75,275.16 145.75,115.8 7,115.8 ; 542,417.8 680.75,417.8 680.75,577.16 542,577.16 542,417.8
  text "IN2N" at 175.8,1101 h25
  text "SMOOTH" at 239.28,1101 h25
  text "RECT" at 348.44,1101 h25
  text "IN2P" at 441.14,1101 h25
  text "GND" at 87.67,969.79 h25
  text "-3V3" at 87.67,881.06 h25
  text "DUAL" at 539.59,605.15 h30
  text "SUPPLY" at 539.59,580.4 h30
  text "MEASURE#" at 280.47,556.67 h25 r90
  text "MEASURE*" at 374.34,556.63 h25 r90
  text "3V3" at 469,556.64 h25 r90
  text "PROCESSED SIGNAL" at 4.09,491.9 h18
  text "RAW SIGNAL" at 4.09,417.94 h18
  text "SIGNAL" at 4.59,303.15 h30
  text "SUPPLY" at 4.59,278.4 h30
  text "OUT1" at 541.48,276.97 h25
  text "MID" at 549.19,186 h25
  text "END" at 264,113.97 h25 r90
  text "*rg" at 361.99,113.97 h25 r90
  text "#rg" at 460.23,113.97 h25 r90
  text "Note:" at 7.19,34.46 h20
  text "BOTH SB3 & SB4 USE TO TEST SINGLE SUPPLY" at 7.19,8.33 h20
Board Outline:
  the board outline again, w5
Fabrication:
  drawing of 163 lines, arcs and shapes, not listed
  text "Layer" at 980.5,963.98 h60
  text "Name" at 1390.41,963.98 h60
  text "Material" at 2320.16,963.98 h60
  text "Thickness" at 2880.02,963.98 h60
  text "Constant" at 3529.86,963.98 h60
  text "Layer Stackup" at 4099.72,963.98 h60
  text "Top Overlay" at 1390.41,843.98 h60
  text "Top Solder" at 1390.41,723.98 h60
  text "SM-001" at 2320.16,723.98 h60
  text "0.39mil" at 2880.02,723.98 h60
  text "3.5" at 3529.86,723.98 h60
  text "1" at 980.5,603.98 h60
  text "Top Layer" at 1390.41,603.98 h60
  text "1.38mil" at 2880.02,603.98 h60
  text "Core" at 1390.41,483.98 h60
  text "FR-4" at 2320.16,483.98 h60
  text "59.06mil" at 2880.02,483.98 h60
  text "4.8" at 3529.86,483.98 h60
  text "2" at 980.5,363.98 h60
  text "Bottom Layer" at 1390.41,363.98 h60
  text "1.38mil" at 2880.02,363.98 h60
  text "Bottom Solder" at 1390.41,243.98 h60
  text "SM-001" at 2320.16,243.98 h60
  text "0.39mil" at 2880.02,243.98 h60
  text "3.5" at 3529.86,243.98 h60
  text "Bottom Overlay" at 1390.41,123.98 h60
  text "Total board thickness:" at 980.5,3.98 h60
  text "62.60mil" at 2880.02,3.98 h60
Drill Drawing:
  circle w10: c1011.12,1418.63 r33.33
  lines w10: 977.79,1601.96 1044.46,1601.96 1011.12,1535.29 977.79,1601.96 ; 977.79,1685.29 1044.46,1685.29 1044.46,1751.96 977.79,1751.96 977.79,1685.29
  lines w15: 918,1340.29 13722.42,1340.29 ; 918,1790.29 13722.42,1790.29 ; 1468.88,1190.29 1468.88,1940.29 ; 2008.74,1190.29 2008.74,1940.29 ; 3108.42,1190.29 3108.42,1940.29 ; 3614.29,1190.29 3614.29,1940.29 ; 4348.09,1190.29 4348.09,1940.29 ; 5847.64,1190.29 5847.64,1940.29 ; 6437.49,1190.29 6437.49,1940.29 ; 7183.29,1190.29 7183.29,1940.29 ; 7933.08,1190.29 7933.08,1940.29 ; 8786.85,1190.29 8786.85,1940.29 ; 10120.46,1190.29 10120.46,1940.29 ; 11454.06,1190.29 11454.06,1940.29 ; 12319.82,1190.29 12319.82,1940.29 ; 918,1190.29 13722.42,1190.29 13722.42,1940.29 918,1940.29 918,1190.29
  text "Symbol" at 1008,1835.29 h72
  text "Count" at 1513.88,1835.29 h72
  text "Hole Size" at 2053.74,1835.29 h72
  text "Plated" at 3153.42,1835.29 h72
  text "Hole Type" at 3659.29,1835.29 h72
  text "Drill Layer Pair" at 4393.09,1835.29 h72
  text "Via/Pad" at 5892.64,1835.29 h72
  text "Pad Shape" at 6482.49,1835.29 h72
  text "Template" at 7228.29,1835.29 h72
  text "Description" at 7978.08,1835.29 h72
  text "Hole Tolerance (+)" at 8831.85,1835.29 h72
  text "Hole Tolerance (-)" at 10165.46,1835.29 h72
  text "Hole Length" at 11499.06,1835.29 h72
  text "Routed Path Length" at 12364.82,1835.29 h72
  text "2" at 1513.88,1685.29 h60
  text "39.37mil (1.000mm)" at 2053.74,1685.29 h60
  text "NPTH" at 3153.42,1685.29 h60
  text "Round" at 3659.29,1685.29 h60
  text "Top Layer - Bottom Layer" at 4393.09,1685.29 h60
  text "Pad" at 5892.64,1685.29 h60
  text "Rounded" at 6482.49,1685.29 h60
  text "c0hn100" at 7228.29,1685.29 h60
  text "-" at 11499.06,1685.29 h60
  text "-" at 12364.82,1685.29 h60
  text "2" at 1513.88,1535.29 h60
  text "78.74mil (2.000mm)" at 2053.74,1535.29 h60
  text "PTH" at 3153.42,1535.29 h60
  text "Round" at 3659.29,1535.29 h60
  text "Top Layer - Bottom Layer" at 4393.09,1535.29 h60
  text "Pad" at 5892.64,1535.29 h60
  text "Rounded" at 6482.49,1535.29 h60
  text "c300h200" at 7228.29,1535.29 h60
  text "-" at 11499.06,1535.29 h60
  text "-" at 12364.82,1535.29 h60
  text "29" at 1513.88,1385.29 h60
  text "11.81mil (0.300mm)" at 2053.74,1385.29 h60
  text "PTH" at 3153.42,1385.29 h60
  text "Round" at 3659.29,1385.29 h60
  text "Top Layer - Bottom Layer" at 4393.09,1385.29 h60
  text "Via" at 5892.64,1385.29 h60
  text "Rounded" at 6482.49,1385.29 h60
  text "v60h30m0mx0" at 7228.29,1385.29 h60
  text "-" at 11499.06,1385.29 h60
  text "-" at 12364.82,1385.29 h60
  text "33 Total" at 1513.88,1235.29 h60

## Dimensions
688.35,1242.79 to 688.34,-0.02 on Dimension
-0.04,1242.82 to 688.35,1242.79 on Dimension